# Altium PCB PCB1.PcbDoc (part 2 of 2)
Units mm, origin at the board's own origin, x right, y up, seen from the top; angles counter-clockwise.
Board outline 128 x 71 mm, 2 copper layers (Top Layer, Bottom Layer); 104 components, 107 nets, 531 pads, 522 vias.
Unrouted connection lines stored in the file: 53.
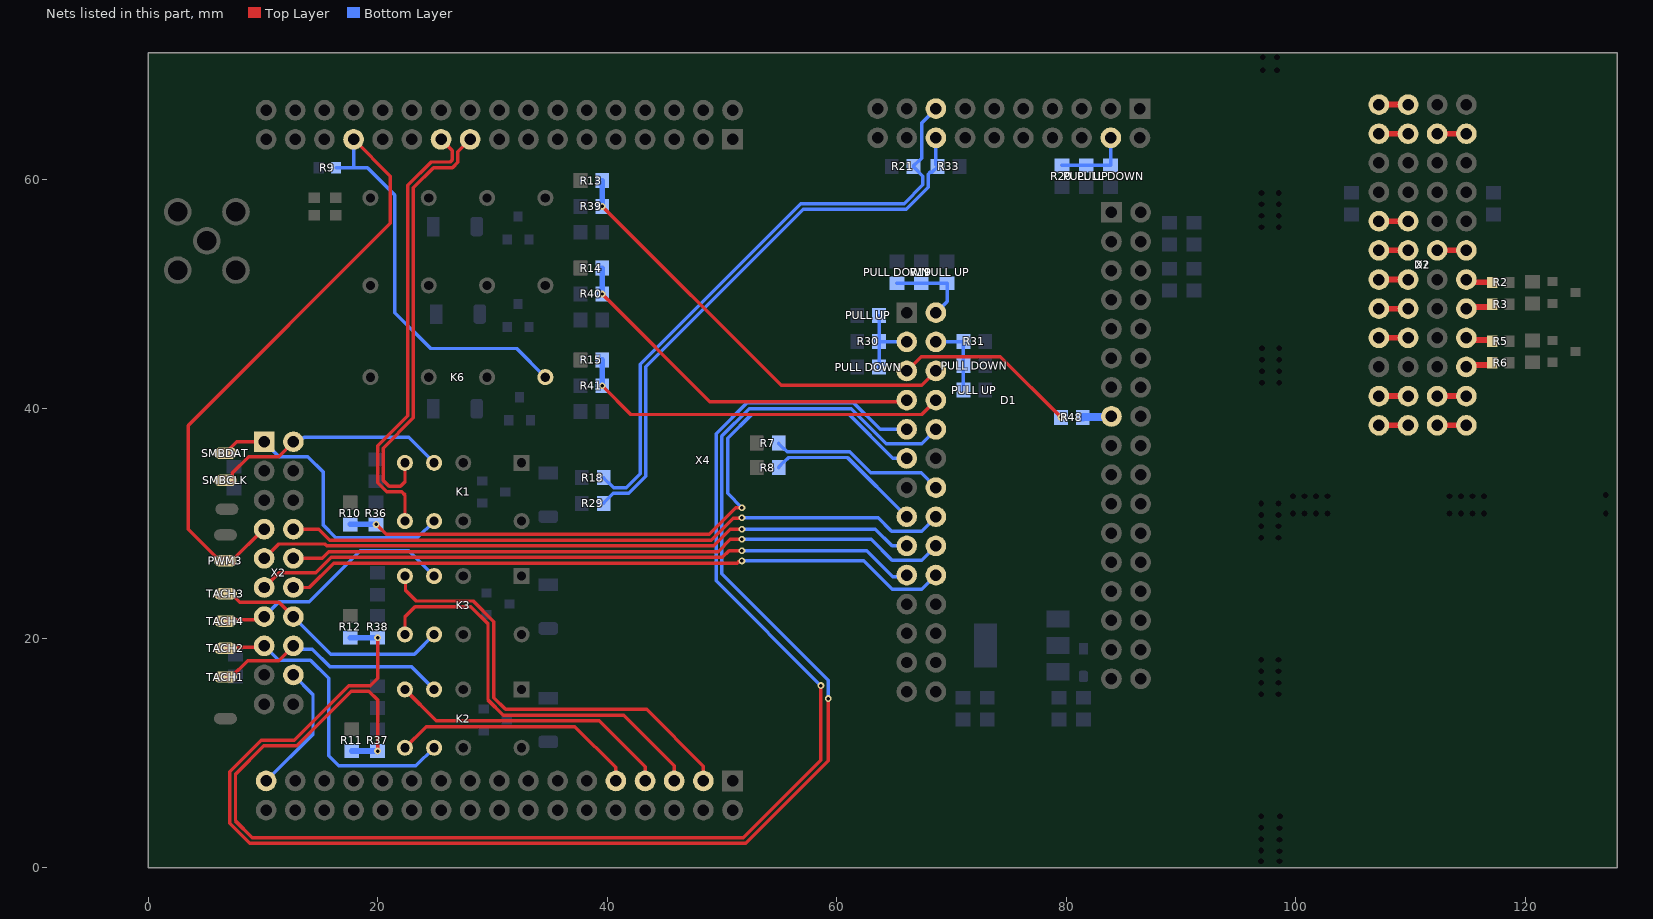
[diagram p2: the nets of this part, all layers, seen from the top]

## Via types
v1: diameter 0.6, hole 0.3, Top Layer to Bottom Layer, tented both sides, 522 vias

## Nets (pads, with @x,y where several pads share a name; then routed paths per layer and width w, separated by ;. In a path a pad name is that pad's centre, name@x,y a point inside that pad or via, vN(x,y) a via of type N, cw(c..) or ccw(c..) an arc to the next point about the centre after c; other vN are vias at no path point) (continued)
PWM3: K6.7 PWM3.1 R9.1 X2.7 X4.14 | length 85.8
  Top Layer w0.3: X2.7@10.125,29.505 10.065,29.505 7.31,26.75 6.25,26.75 3.5,29.5 3.5,38.539 21.125,56.164 21.125,60.255 X4.14@17.91,63.47
  Bottom Layer w0.3: R9.1@16.385,61 17.91,61 ; X4.14@17.91,63.47 17.91,61 ; K6.7@34.62,42.75 32.12,45.25 24.625,45.25 21.5,48.375 21.5,58.625 19.125,61 17.91,61
PWM3_LM: D2.13 X?.13 | length 2.5
  Top Layer w0.5: X?.13@112.33,38.56 D2.13@114.87,38.56
READ: D1.14X3 R7.1 | length 15.3
  Bottom Layer w0.3: R7.1@54.95,37 54.95,36.95 55.4,36.5 55.45,36.5 55.7,36.25 61.157,36.25 62.987,34.42 67.36,34.42 D1.14X3@68.65,33.13
RELE1: D1.11X3 R10.1 R36.1 | length 60.1
  Top Layer w0.3: v1(19.875,29.925) 20.75,29.05 48.886,29.05 51.211,31.375 v1(51.75,31.375)
  Bottom Layer w0.3: v1(51.75,31.375) 50.5,32.625 50.5,37.418 52.582,39.5 61.082,39.5 64.893,35.689 66.091,35.689 D1.11X3@66.11,35.67
  Bottom Layer w0.5: R10.1@17.625,29.925 v1(19.875,29.925)
RELE2: D1.9X3 R11.1 R37.1 | length 131.8
  Top Layer w0.3: v1(20,10.175) 20,14.625 19.25,15.375 17.707,15.375 12.957,10.625 10.082,10.625 7.625,8.168 7.625,4.082 9.082,2.625 51.875,2.625 58.625,9.375 v1(58.625,15.875)
  Bottom Layer w0.3: v1(58.625,15.875) 49.5,25 49.5,37.832 52.168,40.5 61.497,40.5 63.787,38.21 D1.9X3@66.11,38.21
  Bottom Layer w0.5: R11.1@17.75,10.175 v1(20,10.175)
RELE3: D1.10X3 R12.1 R38.1 | length 136.1
  Top Layer w0.3: v1(20,20.05) 20,16.5 19.375,15.875 17.5,15.875 12.75,11.125 9.875,11.125 7.125,8.375 7.125,3.875 8.875,2.125 52.082,2.125 59.275,9.318 v1(59.275,14.75)
  Bottom Layer w0.3: v1(59.275,14.75) 59.275,16.35 50,25.625 50,37.625 52.375,40 61.29,40 64.33,36.96 67.4,36.96 D1.10X3@68.65,38.21
  Bottom Layer w0.5: R12.1@17.625,20.05 v1(20,20.05)
RELE4: D1.6X3 R13.1 R39.1 | length 38.3
  Top Layer w0.3: v1(39.575,57.625) 55.16,42.04 67.4,42.04 D1.6X3@68.65,43.29
  Bottom Layer w0.5: v1(39.575,57.625) R13.1@39.575,59.875
RELE5: D1.7X3 R14.1 R40.1 | length 32.7
  Top Layer w0.3: v1(39.575,50) 48.95,40.625 65.985,40.625 D1.7X3@66.11,40.75
  Bottom Layer w0.5: v1(39.575,50) R14.1@39.575,52.25
RELE6: D1.8X3 R15.1 R41.1 | length 32.9
  Top Layer w0.3: v1(39.575,42) 42.075,39.5 67.4,39.5 D1.8X3@68.65,40.75
  Bottom Layer w0.5: v1(39.575,42) R15.1@39.575,44.25
REMOTE1+_LM: D2.18 R2.2 | length 2.4
  Top Layer w0.5: D2.18@114.87,51.26 115.119,51.011 116.915,51.011 116.979,51.075 R2.2@117.115,51.075
REMOTE1-_LM: D2.17 R3.2 | length 2.4
  Top Layer w0.5: D2.17@114.87,48.72 115.025,48.875 116.915,48.875 117.115,49.075 R3.2@117.115,49.125
REMOTE2+_LM: D2.16 R5.2 | length 2.4
  Top Layer w0.5: D2.16@114.87,46.18 115.05,46 116.99,46 R5.2@117.115,45.875
REMOTE2-_LM: D2.15 R6.2 | length 2.4
  Top Layer w0.5: D2.15@114.87,43.64 115.05,43.82 116.935,43.82 R6.2@117.115,44
RESET_MC: D1.5X3 R48.1 | length 16.1
  Top Layer w0.3: D1.5X3@66.11,43.29 67.36,44.54 74.26,44.54 v1(79.55,39.25)
RST_IN: R48.2 X4.OUT3 | length 2.5
  Bottom Layer w0.7: R48.2@81.45,39.25 81.49,39.29 83.91,39.29 X4.OUT3@83.95,39.33
SCL_F: K1.5 X4.10 | length 37.7
  Top Layer w0.3: K1.5@22.39,35.29 22.39,33.64 22,33.25 21,33.25 20.5,33.75 20.5,36.574 23.125,39.199 23.125,59.25 24.875,61 26.531,61 27,61.469 27,62.4 X4.10@28.07,63.47
SCL_MC: D1.15X2 R18.2 R21.1 | length 52.5
  Bottom Layer w0.3: R18.2@39.7,34 39.7,33.95 40.15,33.5 40.2,33.5 40.575,33.125 41.668,33.125 42.875,34.332 42.875,43.875 56.875,57.875 65.875,57.875 67.5,59.5 67.5,60.275 66.7,61.075 R21.1@66.7,61.125 66.7,61.175 67.15,61.625 67.2,61.625 67.4,61.825 67.4,64.9 D1.15X2@68.65,66.15
SDA_F: K1.8 X4.11 | length 39.1
  Top Layer w0.3: K1.8@22.39,30.21 22.39,32.485 22.125,32.75 20.793,32.75 20,33.543 20,36.781 22.625,39.406 22.625,59.457 24.668,61.5 26.324,61.5 26.5,61.676 26.5,62.5 X4.11@25.53,63.47
SDA_MC: D1.16X2 R29.2 R33.1 | length 50.1
  Bottom Layer w0.3: R29.2@39.7,31.75 39.7,31.8 40.15,32.25 40.525,32.625 41.875,32.625 43.375,34.125 43.375,43.668 57.082,57.375 66.082,57.375 68,59.293 68,60.449 68.176,60.625 68.35,60.625 68.8,61.075 R33.1@68.8,61.125 68.65,61.275 D1.16X2@68.65,63.61
SMBCLK: K1.4 SMBCLK.1 X2.2 | length 20.8
  Top Layer w0.3: SMBCLK.1@6.75,33.75 7.018,33.75 7.341,34.073 7.341,34.402 8.774,35.835 11.375,35.835 X2.2@12.665,37.125
  Bottom Layer w0.3: X2.2@12.665,37.125 12.952,37.412 13.503,37.412 13.591,37.5 22.72,37.5 K1.4@24.93,35.29
SMBCLK_LM: D2.2 X?.2 | length 2.5
  Top Layer w0.5: D2.2@107.25,63.96 X?.2@109.79,63.96
SMBDAT: K1.9 SMBDAT.1 X2.1 | length 25.4
  Top Layer w0.3: SMBDAT.1@6.75,36.125 7.75,37.125 X2.1@10.125,37.125
  Bottom Layer w0.3: X2.1@10.125,37.125 11.415,35.835 13.915,35.835 15.25,34.5 15.25,29.875 16.375,28.75 23.47,28.75 K1.9@24.93,30.21
SMBDAT_LM: D2.1 X?.1 | length 2.5
  Top Layer w0.5: D2.1@107.25,66.5 X?.1@109.79,66.5
TACH1: K2.4 TACH1.1 X2.16 | length 20.9
  Top Layer w0.3: TACH1.1@6.75,16.625 7.25,16.625 8.68,18.055 11.375,18.055 X2.16@12.665,19.345
  Bottom Layer w0.3: X2.16@12.665,19.345 12.95,19.06 14.315,19.06 15.875,17.5 22.97,17.5 K2.4@24.93,15.54
TACH1_F: K2.5 X4.62 | length 25
  Top Layer w0.3: K2.5@22.39,15.54 25.121,12.809 39.316,12.809 43.31,8.815 X4.62@43.31,7.57
TACH1_LM: D2.11 X?.11 | length 2.5
  Top Layer w0.5: D2.11@107.25,41.1 X?.11@109.79,41.1
TACH1_MC: "PULL DOWN.2"@65.25,50.925 "PULL UP.1"@69.625,50.925 D1.2X3 R19.2 | length 7.3
  Bottom Layer w0.3: 65.25,50.925 R19.2@67.375,50.925 69.625,50.925 69.625,49.345 D1.2X3@68.65,48.37
TACH2: K2.9 TACH2.1 X2.15 | length 27.2
  Top Layer w0.3: TACH2.1@6.75,19.125 6.86,19.235 10.015,19.235 X2.15@10.125,19.345
  Bottom Layer w0.3: X2.15@10.125,19.345 11.375,18.095 14.155,18.095 15.75,16.5 15.75,9.75 16.625,8.875 23.345,8.875 K2.9@24.93,10.46
TACH2_F: K2.8 X4.61 | length 21.8
  Top Layer w0.3: K2.8@22.39,10.46 24.239,12.309 37.191,12.309 40.756,8.744 40.756,7.584 X4.61@40.77,7.57
TACH2_LM: D2.12 X?.12 | length 2.5
  Top Layer w0.5: D2.12@107.25,38.56 X?.12@109.79,38.56
TACH2_MC: "PULL DOWN.2"@63.7,43.625 "PULL UP.1"@63.7,48.125 D1.3X3 R30.2 | length 6.9
  Bottom Layer w0.3: 63.7,43.625 63.7,48.125 ; R30.2@63.7,45.875 63.745,45.83 D1.3X3@66.11,45.83
TACH3: K3.9 TACH3.1 X2.14 | length 21.1
  Top Layer w0.3: TACH3.1@6.75,23.875 7.25,23.875 7.99,23.135 11.415,23.135 X2.14@12.665,21.885
  Bottom Layer w0.3: X2.14@12.665,21.885 15.925,18.625 23.22,18.625 K3.9@24.93,20.335
TACH3_F: K3.8 X4.63 | length 36.3
  Top Layer w0.3: K3.8@22.39,20.335 22.39,21.875 23.265,22.75 28.125,22.75 29.625,21.25 29.625,14.625 30.941,13.309 41.441,13.309 45.85,8.9 X4.63@45.85,7.57
TACH3_LM: D2.9 X?.9 | length 2.5
  Top Layer w0.5: D2.9@107.25,46.18 X?.9@109.79,46.18
TACH3_MC: "PULL DOWN.2"@71.05,43.75 "PULL UP.1"@71.05,41.625 D1.4X3 R31.2 | length 6.7
  Bottom Layer w0.3: D1.4X3@68.65,45.83 71.005,45.83 R31.2@71.05,45.875 71.05,43.75 71.05,41.625
TACH4: K3.4 TACH4.1 X2.13 | length 21.6
  Top Layer w0.3: TACH4.1@6.75,21.5 6.875,21.625 9.865,21.625 X2.13@10.125,21.885
  Bottom Layer w0.3: X2.13@10.125,21.885 11.415,23.175 14.05,23.175 18.5,27.625 22.72,27.625 K3.4@24.93,25.415
TACH4_F: K3.5 X4.64 | length 38.7
  Top Layer w0.3: K3.5@22.39,25.415 22.434,25.371 22.434,24.191 23.375,23.25 28.332,23.25 30.125,21.457 30.125,14.832 31.148,13.809 43.441,13.809 48.39,8.86 X4.64@48.39,7.57
TACH4_LM: D2.14 X?.14 | length 2.5
  Top Layer w0.5: X?.14@112.33,41.1 D2.14@114.87,41.1
TACH4_MC: "PULL DOWN.2"@83.875,61.2 "PULL UP.1"@81.75,61.2 D1.4X2 R20.2 | length 6.7
  Bottom Layer w0.3: R20.2@79.625,61.2 83.875,61.2 83.89,61.215 D1.4X2@83.89,63.61
VCCP_IN: X2.18 X4.49 | length 11.6
  Bottom Layer w0.3: X4.49@10.29,7.57 14.375,11.655 14.375,15.095 X2.18@12.665,16.805
VCCP_IN_LM: D2.23 X?.23 | length 2.5
  Top Layer w0.5: X?.23@112.33,63.96 D2.23@114.87,63.96
VID0: D1.16X3 X2.8 | length 58.2
  Top Layer w0.3: X2.8@12.665,29.505 14.87,29.505 15.825,28.55 49.093,28.55 51,30.457 51.707,30.457 v1(51.75,30.5)
  Bottom Layer w0.3: v1(51.75,30.5) 63.625,30.5 64.785,29.34 67.4,29.34 D1.16X3@68.65,30.59
VID0_LM: D2.5 X?.5 | length 2.5
  Top Layer w0.5: D2.5@107.25,56.34 X?.5@109.79,56.34
VID1: D1.17X3 X2.9 | length 57.8
  Top Layer w0.3: X2.9@10.125,26.965 11.375,28.215 15.41,28.215 15.575,28.05 49.3,28.05 50.75,29.5 v1(51.75,29.5)
  Bottom Layer w0.3: v1(51.75,29.5) 63.375,29.5 64.825,28.05 D1.17X3@66.11,28.05
VID1_LM: D2.6 X?.6 | length 2.5
  Top Layer w0.5: D2.6@107.25,53.8 X?.6@109.79,53.8
VID2: D1.18X3 X2.10 | length 57.9
  Top Layer w0.3: X2.10@12.665,26.965 15.176,26.965 15.761,27.55 49.675,27.55 50.75,28.625 v1(51.75,28.625)
  Bottom Layer w0.3: v1(51.75,28.625) 63,28.625 64.825,26.8 67.4,26.8 D1.18X3@68.65,28.05
VID2_LM: D2.7 X?.7 | length 2.5
  Top Layer w0.5: D2.7@107.25,51.26 X?.7@109.79,51.26
VID3: D1.19X3 X2.11 | length 58.3
  Top Layer w0.3: X2.11@10.125,24.425 11.415,25.715 14.633,25.715 15.968,27.05 50.05,27.05 50.625,27.625 v1(51.75,27.625)
  Bottom Layer w0.3: v1(51.75,27.625) 62.625,27.625 64.875,25.375 65.975,25.375 D1.19X3@66.11,25.51
VID3_LM: D2.8 X?.8 | length 2.5
  Top Layer w0.5: D2.8@107.25,48.72 X?.8@109.79,48.72
VID4: D1.20X3 X2.12 | length 58.5
  Top Layer w0.3: X2.12@12.665,24.425 14.05,24.425 16.175,26.55 51.35,26.55 51.492,26.693 51.693,26.693 v1(51.75,26.75)
  Bottom Layer w0.3: v1(51.75,26.75) 62.375,26.75 64.865,24.26 67.4,24.26 D1.20X3@68.65,25.51
VID4_LM: D2.19 X?.19 | length 2.5
  Top Layer w0.5: X?.19@112.33,53.8 D2.19@114.87,53.8
WRITE: D1.15X3 R8.1 | length 13.7
  Bottom Layer w0.3: R8.1@54.95,34.875 54.95,34.925 55.4,35.375 55.45,35.375 55.825,35.75 60.95,35.75 D1.15X3@66.11,30.59
pads on no net: D1.1X3 D1.6X2 D1.8X2 D1.9X2 D1.10X2 D1.11X2 D1.12X2 D1.12X3 D1.13X2 D1.13X3 D1.14X2 D1.17X2 D1.18X2 D1.19X2 D1.20X2 X4.1 X4.2 X4.3 X4.4 X4.5 X4.6 X4.7 X4.8 X4.9 X4.17 X4.18 X4.19 X4.20 X4.21 X4.22 X4.23 X4.24 X4.25 X4.26 X4.27 X4.28 X4.29 X4.30 X4.31 X4.34 X4.35 X4.36 X4.37 X4.38 X4.39 X4.40 X4.41 X4.42 X4.43 X4.44 X4.45 X4.46 X4.47 X4.48 X4.50 X4.51 X4.52 X4.53 X4.54 X4.55 X4.56 X4.57 X4.58 X4.59 X4.60 X4.+12V X4.-12V X4.IN-OUT2 X4.IN-OUT3 X4.IN-OUT4 X4.IN-OUT5 X4.IN-OUT6 X4.IN-OUT7 X4.IN-OUT8 X4.NC X4.OUT4 X4.OUT5 X4.OUT6 X4.OUT7 X4.OUT8 X4.VDDF X4.VDDS X4.VEEF X4.VEES

## Polygon pours and split planes (outlines as drawn)
GND_LM on Top Layer "NONET_L-01_P-001" (solid, remove dead copper, pour order 1): 127,70 101.75,70 101.75,35.625 127,35.625
GND on Top Layer "NONET_L-01_P-001" (solid, remove dead copper, pour order 0): 0.5,70.5 0.5,0.503 93.75,0.503 93.75,70.5
GND on Bottom Layer "NONET_L-01_P-001" (solid, remove dead copper, pour order 3): 0.5,70.5 0.5,0.5 93.75,0.5 93.75,70.5
GND_LM on Bottom Layer "NONET_L-01_P-001" (solid, remove dead copper, pour order 2): 101.75,70 101.75,35.625 127,35.625 127,70

## Other copper
Top Layer:
  pour cut-out: 25.838,10.46 25.838,12.309 24.239,12.309
  pour cut-out: 22.39,9.552 24.93,9.552 24.93,10.46
  pour cut-out: 83.95,38.221 81.75,38.221 81.75,39.67
  pour cut-out: 85.059,39.33 85.059,41.87 83.95,41.87
  pour cut-out: 26.668,60.67 25.375,60.67 25.375,59.25
  pour cut-out: 13.939,66.01 13.939,68.625 12.25,68.625
  pour cut-out: 11.721,66.01 11.721,68.125 11.87,68.125
  pour cut-out: 16.801,63.47 16.801,60.5 18.75,60.5
  pour cut-out: 13.774,14.265 13.774,16.805 12.665,16.805
  pour cut-out: 10.125,13.156 12.665,13.156 12.665,14.265
  pour cut-out: 121.279,43.25 123.025,43.25 123.025,46.75
  pour cut-out: 120.921,46.75 123.025,46.75 123.025,46.287
  pour cut-out: 121.475,46.75 121.475,43.25 115,43.25 115,46.75 119.775,46.75
  pour cut-out: 123.025,51.439 123.025,48.375 115.625,48.375 115.625,50.5 115.875,50.5
  pour cut-out: 120.785,50.275 123.025,50.275 123.025,50.768
  pour cut-out: 121.046,51.875 123.025,51.875 123.025,51.439
  pour cut-out: 116.465,50.275 116.465,51.875 115.66,51.875 115.66,50.275
  pour cut-out: 121.475,51.875 116.465,51.875 116.465,50.275 121.475,50.275
  pour cut-out: 116.465,51.7 114.87,51.7 114.87,51.26
  pour cut-out: 109.79,62.851 112.33,62.851 112.33,63.96
  pour cut-out: 111.221,61.42 111.221,58.88 112.33,58.88
  pour cut-out: 111.221,61.42 111.221,66.5 112.33,66.5
  pour cut-out: 110.899,43.64 110.899,41.1 109.79,41.1
  pour cut-out: 110.899,43.64 110.899,53.8 109.79,53.8
  pour cut-out: 112.33,42.209 107.25,42.209 107.25,41.1
  pour cut-out: 112.33,42.209 114.87,42.209 114.87,41.1
  pour cut-out: 113.761,43.64 113.761,41.1 114.87,41.1
  pour cut-out: 113.761,43.64 113.761,51.26 114.87,51.26
  pour cut-out: 113.761,51.26 113.761,53.8 114.87,53.8
  pour cut-out: 112.33,52.691 114.87,52.691 114.87,53.8
  pour cut-out: 112.33,52.691 107.25,52.691 107.25,53.8
  pour cut-out: 107.25,59.989 114.884,59.989 114.884,58.866
  pour cut-out: 106.141,38.56 106.141,58.88 107.25,58.88
  pour cut-out: 114.87,37.451 107.25,37.451 107.25,38.56
  pour cut-out: 115.979,66.5 115.979,38.56 114.87,38.56
  pour cut-out: 107.25,67.609 114.87,67.609 114.87,66.5
  pour cut-out: 107.25,62.851 109.79,62.851 109.79,63.96
  pour cut-out: 106.141,66.5 106.141,63.96 107.25,63.96
  pour cut-out: 17.125,62.685 18.598,62.685 18.598,61.273
  pour cut-out: 28.855,62.685 26.668,62.685 26.668,60.67
  pour cut-out: 27.33,61.332 27.33,63.47 29.179,63.47
  pour cut-out: 23.298,20.335 23.298,22.75 22.75,22.75
  pour cut-out: 29.268,14.625 29.268,12.75 30.25,12.75
  pour cut-out: 65.001,43.25 65.001,40.688 66.048,40.688
  pour cut-out: 65.001,45.83 65.001,43.25 66.11,43.25 66.11,43.29
  pour cut-out: 66.11,46.939 68.65,46.939 68.65,45.83
  pour cut-out: 65.001,38.21 65.001,40.75 66.11,40.75
  pour cut-out: 69.759,38.21 69.759,40.75 68.65,40.75
  pour cut-out: 66.11,37.101 68.75,37.101 68.75,38.375
  pour cut-out: 69.759,43.29 69.759,45.83 68.65,45.83
  pour cut-out: 69.759,43.29 69.759,40.75 68.65,40.75
  pour cut-out: 87.599,46.95 87.599,44.41 86.49,44.41
  pour cut-out: 83.95,48.059 86.49,48.059 86.49,46.95
  pour cut-out: 82.878,47.237 82.878,44.41 83.95,44.41
  pour cut-out: 83.95,40.761 86.49,40.761 86.49,41.87
  pour cut-out: 87.599,44.41 87.599,41.87 86.49,41.87
  pour cut-out: 69.759,22.97 69.759,20.43 68.65,20.43
  pour cut-out: 66.11,24.079 68.65,24.079 68.65,22.97
  pour cut-out: 65.001,22.97 65.001,20.43 66.11,20.43
  pour cut-out: 69.759,15.35 69.759,17.918 68.559,17.918
  pour cut-out: 64.963,15.477 64.963,17.238 63.92,17.238
  pour cut-out: 67.166,15.505 68.559,15.505 68.559,17.918
  pour cut-out: 59.096,16.07 59.096,14.945 59.746,14.945
  pour cut-out: 52.375,44.875 52.375,40.625 54.5,40.625
  pour cut-out: 46.125,43.375 46.125,39.5 48.125,39.5
  pour cut-out: 40.77,6.461 48.39,6.461 48.39,7.57
  pour cut-out: 39.661,7.57 39.661,9.625 40.375,9.625
  pour cut-out: 25.368,42.75 25.368,41 24.75,41
  pour cut-out: 19.365,29.925 19.365,28.625 20.25,28.625
  pour cut-out: 21.512,30.435 21.512,33.64 22.39,33.64
  pour cut-out: 19.875,30.435 22.39,30.435 22.39,30.21
  pour cut-out: 28.378,25.415 28.378,22.875 27.5,22.875
  pour cut-out: 28.378,25.415 28.378,27.125 28,27.125
  pour cut-out: 21.482,25.415 21.482,27.625 22.5,27.625
  pour cut-out: 22.077,24.57 22.077,20.335 22.39,20.335
  pour cut-out: 21.482,15.54 21.482,10.46 22.39,10.46
  pour cut-out: 13.774,16.805 13.774,24.425 12.665,24.425
  pour cut-out: 12.665,15.696 10.125,15.696 10.125,16.805
  pour cut-out: 10.125,15.696 5.567,15.696 5.567,16.625
  pour cut-out: 5.567,26.928 5.567,16.625 6.75,16.625
  pour cut-out: 9.016,26.965 9.016,29.505 10.125,29.505
  pour cut-out: 13.774,32.045 13.774,29.505 12.665,29.505
  pour cut-out: 12.665,33.154 10.125,33.154 10.125,32.045
  pour cut-out: 11.234,34.585 11.234,32.045 10.125,32.045
  pour cut-out: 12.665,36.016 10.125,36.016 10.125,37.125
  pour cut-out: 11.234,34.585 11.234,37.125 10.125,37.125
  pour cut-out: 10.878,38.225 12.665,38.225 12.665,36.86
  pour cut-out: 9.527,38.225 4,38.225 4,36.053
  pour cut-out: 13.8,59.035 17.075,59.035 17.075,56.215 13.75,56.215 13.75,56.25
  pour cut-out: 25.368,58.375 25.368,42.75 24.46,42.75
  pour cut-out: 25.368,58.375 25.368,61.5 24.668,61.5
  pour cut-out: 19.38,57.467 21.125,57.467 21.125,58.291
  pour cut-out: 18.598,58.834 18.598,63.47 20.45,63.47
  pour cut-out: 28.07,62.361 25.53,62.361 25.53,63.47
  pour cut-out: 25.53,64.579 28.07,64.579 28.07,63.47
  pour cut-out: 22.99,64.579 25.53,64.579 25.53,63.47
  pour cut-out: 20.45,64.579 22.99,64.579 22.99,63.47
  pour cut-out: 17.91,64.579 20.45,64.579 20.45,63.47
Bottom Layer:
  pour cut-out: 31.673,20.57 31.673,23 33.25,23
  pour cut-out: 31.642,10.46 31.642,13 32.875,13
  pour cut-out: 31.673,30.445 31.673,32.75 33.25,32.75
  pour cut-out: 28.378,30.21 28.378,29.125 27.75,29.125
  pour cut-out: 28.378,30.21 28.378,32 27.25,32
  pour cut-out: 16.238,28.819 16.238,25.75 17.114,25.75
  pour cut-out: 24.93,24.507 27.47,24.507 27.47,25.415
  pour cut-out: 17.122,12.875 15.5,12.875 15.5,11.571
  pour cut-out: 12.83,6.461 10.29,6.461 10.29,7.57
  pour cut-out: 11.399,5.03 11.399,2.25 10.25,2.25
  pour cut-out: 11.399,5.03 11.399,7.57 10.29,7.57
  pour cut-out: 24.93,9.552 22.39,9.552 22.39,10.46
  pour cut-out: 25.838,10.46 25.838,12.25 24,12.25
  pour cut-out: 27.107,59.25 27.107,60.75 26.375,60.75
  pour cut-out: 23.795,59.768 22.812,59.768 22.812,60.125
  pour cut-out: 14.261,63.47 14.261,61 14.865,61
  pour cut-out: 12.83,6.461 15.37,6.461 15.37,7.57
  pour cut-out: 10.125,15.696 7.69,15.696 7.69,16.74
  pour cut-out: 68.65,44.721 71.05,44.721 71.05,45.875
  pour cut-out: 68.65,46.939 71.005,46.939 71.005,45.83
  pour cut-out: 66.11,46.939 63.723,46.939 63.723,45.853
  pour cut-out: 66.11,44.721 63.7,44.721 63.7,45.875
  pour cut-out: 114.87,59.989 118.1,59.989 118.1,58.025 114.75,58.025 114.75,58
  pour cut-out: 107.25,59.989 104.025,59.989 104.025,58.025 107.25,58.025 107.25,57.875
  pour cut-out: 16.107,16.5 16.107,17.75 15.25,17.75
  pour cut-out: 20.85,14.725 19.15,14.725 19.15,9.232 20.85,9.232
  pour cut-out: 16.9,12.875 20.85,12.875 20.85,7.875 16.875,7.875
  pour cut-out: 29.54,43.658 29.54,41 32.375,41
  pour cut-out: 29.54,51.658 29.54,49.1 32.25,49.1
  pour cut-out: 29.54,59.283 29.54,56.779 32.25,56.779
  pour cut-out: 68.357,59.293 68.357,56.875 67.245,56.875
  pour cut-out: 86.49,50.921 89,50.921 89,52.2
  pour cut-out: 86.49,55.679 89,55.679 89,54.3
  pour cut-out: 91.975,55.4 88.15,55.4 88.15,57 91.975,57
  pour cut-out: 91.975,51.1 91.975,49.5 89.5,49.5 89.5,51.125
  pour cut-out: 88.15,57 89.85,57 89.85,49.5 88.15,49.5
  pour cut-out: 82.841,54.57 82.841,52.04 83.96,52.04
  pour cut-out: 83.95,53.139 86.533,53.139 86.533,52.073
  pour cut-out: 83.95,50.921 86.49,50.921 86.49,52.03
  pour cut-out: 83.95,55.679 86.49,55.679 86.49,54.57
  pour cut-out: 83.95,53.461 86.49,53.461 86.49,54.57
  pour cut-out: 84.999,63.61 84.999,60.4 82.6,60.4
  pour cut-out: 84.725,60.4 84.725,63.61 83.89,63.61
  pour cut-out: 82.781,63.61 82.781,60.4 84.725,60.4
  pour cut-out: 84.725,60.4 78.775,60.4 78.775,62 84.725,62
  pour cut-out: 78.775,62 78.775,58.5 82.6,58.5 82.6,62
  pour cut-out: 81.8,40.1 83.95,40.1 83.95,39.126
  pour cut-out: 81.696,38.4 83.95,38.4 83.95,39.633
  pour cut-out: 78.75,40.1 78.75,38.4 82.25,38.4 82.25,40.1
  pour cut-out: 78.075,20.325 78.075,16.125 79.75,16.125
  pour cut-out: 83.95,20.119 79.275,20.119 79.275,19.375
  pour cut-out: 83.95,17.901 79.275,17.901 79.275,19.375
  pour cut-out: 80.059,18.025 82.35,18.025 82.35,15.092
  pour cut-out: 86.49,20.119 83.95,20.119 83.95,19.01
  pour cut-out: 86.49,17.901 83.95,17.901 83.95,19.01
  pour cut-out: 78.525,15.625 78.525,14.025 82.35,14.025 82.35,15.625
  pour cut-out: 73.975,15.625 73.975,14.025 70.125,14.025 70.125,15.75
  pour cut-out: 41.875,32.268 44.375,32.268 44.375,33.625
  pour cut-out: 41.874,22.892 45.375,22.892 45.375,24.625
  pour cut-out: 58.265,15.515 58.915,15.515 58.915,14.39
  pour cut-out: 65.001,22.97 65.001,25.51 66.11,25.51
  pour cut-out: 66.11,21.861 68.65,21.861 68.65,22.97
  pour cut-out: 67.541,15.35 67.541,22.97 68.65,22.97
  pour cut-out: 69.759,22.97 69.759,15.35 68.65,15.35
  pour cut-out: 69.759,25.51 69.759,22.97 68.65,22.97
  pour cut-out: 69.759,28.05 69.759,25.51 68.65,25.51
  pour cut-out: 69.759,30.59 69.759,28.05 68.65,28.05
  pour cut-out: 69.759,33.13 69.759,30.59 68.65,30.59
  pour cut-out: 69.759,35.67 69.759,33.13 68.65,33.13
  pour cut-out: 69.759,38.21 69.759,35.67 68.65,35.67
  pour cut-out: 69.759,40.75 69.759,38.21 68.65,38.21
  pour cut-out: 66.11,41.859 68.65,41.859 68.65,40.75
  pour cut-out: 65.001,40.75 65.001,38.21 66.11,38.21
  pour cut-out: 73.75,42.475 73.75,40.775 71.625,40.775 71.625,42.5
  pour cut-out: 71.85,46.725 71.85,45.025 73.75,45.025 73.75,46.725
  pour cut-out: 70.25,46.725 70.25,40.775 71.85,40.775 71.85,46.725
  pour cut-out: 67.541,48.37 67.541,50.925 69.625,50.925
  pour cut-out: 64.5,48.975 64.5,42.775 62.875,42.775 62.875,48.625
  pour cut-out: 61,48.975 61,45.025 64.5,45.025 64.5,48.975
  pour cut-out: 70.475,50.125 70.475,53.625 66.525,53.625 66.525,50.875 66.625,50.875
  pour cut-out: 64.4,51.725 70.475,51.725 70.475,50.125 64.4,50.125
  pour cut-out: 69.759,63.61 69.759,61.2 68.725,61.2
  pour cut-out: 69.759,66.15 69.759,63.61 68.65,63.61
  pour cut-out: 66.11,67.259 68.65,67.259 68.65,66.15
  pour cut-out: 65.001,66.15 65.001,63.61 66.11,63.61
  pour cut-out: 65.001,63.61 65.001,61.175 66.7,61.175
  pour cut-out: 64,61.975 71.5,61.975 71.5,60.275 64,60.275
  pour cut-out: 52.11,26.39 52.11,24 51.5,24
  pour cut-out: 35.934,21.125 35.934,19.125 34.625,19.125
  pour cut-out: 31.642,20.335 31.642,19 32.5,19
  pour cut-out: 35.925,25.4 35.925,26.625 32.903,26.625
  pour cut-out: 20.85,19.25 19.15,19.25 19.15,24.6 20.85,24.6
  pour cut-out: 16.775,22.75 20.85,22.75 20.85,19.25 16.775,19.25
  pour cut-out: 25.838,20.335 25.838,15.54 24.93,15.54
  pour cut-out: 36.799,7.57 36.799,10.125 36.125,10.125
  pour cut-out: 28.07,6.461 35.69,6.461 35.69,7.57
  pour cut-out: 26.961,7.57 26.961,10.46 27.47,10.46
  pour cut-out: 24.099,7.57 24.099,9.25 23.625,9.25
  pour cut-out: 17.91,6.461 22.99,6.461 22.99,7.57
  pour cut-out: 15.37,6.461 17.91,6.461 17.91,7.57
  pour cut-out: 10.125,15.696 12.665,15.696 12.665,16.805
  pour cut-out: 9.033,19.345 9.033,16.805 10.125,16.805
  pour cut-out: 9.033,21.75 9.033,19.345 10.125,19.345
  pour cut-out: 13.737,24.712 13.737,21.885 12.665,21.885
  pour cut-out: 10.125,20.776 12.665,20.776 12.665,21.885
  pour cut-out: 9.016,24.425 9.016,21.75 10.25,21.75
  pour cut-out: 10.125,25.534 12.665,25.534 12.665,24.425
  pour cut-out: 15.25,34.5 15.25,37.125 13.935,37.125
  pour cut-out: 13.75,34.735 14.688,34.735 14.688,35.148
  pour cut-out: 11.513,34.758 10.12,34.758 10.12,37.171
  pour cut-out: 10.917,38.225 12.665,38.225 12.665,36.89
  pour cut-out: 9.296,38.225 7.375,38.225 7.375,36.508
  pour cut-out: 16.775,32.625 16.775,28.75 20.725,28.75 20.725,34.475 19.025,34.475 19.025,32.625
  pour cut-out: 34.834,31.359 37.875,31.359 37.875,30.625
  pour cut-out: 31.673,30.445 31.673,29 32.125,29
  pour cut-out: 31.65,34.39 36,34.39 36,36.75
  pour cut-out: 31.65,34.39 31.65,36.75 33.125,36.75
  pour cut-out: 33.825,33.65 37.78,33.65 37.78,34.97
  pour cut-out: 37,34.85 37,30.9 40.5,30.9 40.5,34.85
  pour cut-out: 38.475,45.1 38.475,41.15 40.375,41.15 40.375,45.1
  pour cut-out: 36.875,40.6 36.875,45.1 38.475,45.1 38.475,38.9
  pour cut-out: 38.475,53.1 38.475,49.15 40.375,49.15 40.375,53.1
  pour cut-out: 36.875,53.1 36.875,46.9 38.475,46.9 38.475,53.1
  pour cut-out: 38.475,60.725 38.475,56.775 40.375,56.775 40.375,60.725
  pour cut-out: 36.875,56.225 36.875,60.725 38.475,60.725 38.475,56.225
  pour cut-out: 29.179,63.47 29.179,60.625 28.125,60.625
  pour cut-out: 25.53,64.579 28.07,64.579 28.07,63.47
  pour cut-out: 22.99,64.579 25.53,64.579 25.53,63.47
  pour cut-out: 20.45,64.579 22.99,64.579 22.99,63.47
  pour cut-out: 21.83,58.762 21.83,60.125 23.795,60.125
  pour cut-out: 17.91,64.579 20.45,64.579 20.45,63.47
  pour cut-out: 15.37,64.579 17.91,64.579 17.91,63.47
  pour cut-out: 14.215,61.7 17.035,61.7 17.035,60.3 14.215,60.3

## Silkscreen, mask and mechanical layers (free items; w line width, h text height)
Top Overlay:
  circle w0.2: c49.363,25.631 r0.2
  region: 11.58,67.22 11.58,64.617 14.095,64.617 14.095,67.197
  region: 82.693,50.698 87.773,50.698 87.773,53.238 82.693,53.238
  region: 82.693,55.778 87.773,55.778 87.773,53.238 82.693,53.238
  region: 107.187,67.75 107.187,69.625 106.125,69.625
  region: 107.187,67.75 107.187,69.625 108.25,69.625
  region: 8.855,38.395 8,39.25 6.625,39.25
  region: 8.855,38.395 8,39.25 8,40.75
  region: 39.4,8.82 39.4,6.28 49.56,6.28 49.56,8.82
  region: 11.5,8.797 11.5,6.269 16.527,6.269 16.527,8.797
  region: 11.58,64.717 11.58,62.14 29.36,62.14 29.36,64.68
  region: 16.486,45.249 17.486,45.249 17.486,46.249
  region: 16.486,53.249 17.486,53.249 17.486,54.249
  region: 16.5,60.875 17.5,60.875 17.5,61.875
  lines w0.2: 47.636,20.544 48.636,20.544 ; 47.636,21.544 48.636,21.544 ; 47.636,22.544 48.636,22.544 ; 47.636,23.544 48.636,23.544 ; 47.636,24.544 48.636,24.544 ; 47.636,25.544 48.636,25.544 ; 47.651,14.544 48.651,14.544 ; 47.651,15.544 48.651,15.544 ; 47.651,16.544 48.651,16.544 ; 47.651,17.544 48.651,17.544 ; 47.651,18.544 48.651,18.544 ; 47.651,19.544 48.651,19.544 ; 52.651,15.544 53.651,15.544 ; 52.651,16.544 53.651,16.544 ; 52.651,17.544 53.651,17.544 ; 52.651,18.544 53.651,18.544 ; 52.651,19.544 53.651,19.544 ; 52.651,20.544 53.651,20.544 ; 52.651,21.544 53.651,21.544 ; 52.651,22.544 53.651,22.544 ; 52.651,23.544 53.651,23.544 ; 52.651,24.544 53.651,24.544 ; 53.651,14.544 52.651,14.544 ; 53.651,25.544 52.651,25.544 ; 48.636,25.544 49.386,26.294 52.651,26.294 52.651,25.544 ; 48.636,25.544 48.651,14.544 ; 48.651,14.544 49.026,14.169 52.276,14.169 52.651,14.544 ; 52.651,14.544 52.651,25.544 ; 16.486,45.249 17.486,46.249 17.486,45.249 16.486,45.249 ; 16.486,53.249 17.486,54.249 17.486,53.249 16.486,53.249 ; 16.5,60.875 17.5,60.875 17.5,61.875 16.5,60.875 ; 106,37.375 108.375,37.375 108.375,67.75 106,67.75 106,37.375 ; 113.75,37.375 116.125,37.375 116.125,67.75 113.75,67.75 113.75,37.375
  text "GND" at 13.397,67.635 h0.6 r45
  text "5V" at 12.147,67.51 h0.6 r45
  text "ADD_EN" at 15.421,67.423 h0.6 r45
  text "PWM3" at 17.935,67.423 h0.6 r45
  text "PWM2" at 20.435,67.423 h0.6 r45
  text "PWM1" at 22.935,67.423 h0.6 r45
  text "SDA_F" at 25.508,67.423 h0.6 r45
  text "SCL_F" at 28.133,67.423 h0.6 r45
  text "PWM1 TO OSC" at 36.767,57.675 h0.6
  text "+12V" at 78.125,53.468 h2
  text "+3.3V" at 78.11,50.843 h2
  text "PWM2 TO OSC" at 36.767,49.925 h0.6
  text "КУ для ИЛ1429ТО1/1" at 104.64,49.002 h3 r90
  text "PWM OUT OSC" at 1.011,46.954 h2
  text "PWM3 TO OSC" at 36.767,42.05 h0.6
  text "TSSOP-24 to DIP7.62" at 104.671,36.25 h2 r90
  text "SDA & SCL TO MC/FK" at 34,31.88 h0.6
  text "Hardware Monitor with Integrated Fan Control" at 42.793,27.33 h3
  text "SMBDAT" at 43.551,25.193 h0.6
  text "PWM1/xTESTOUT" at 53.95,25.193 h0.6
  text "SMBCLK" at 43.551,24.184 h0.6
  text "VCCP_IN" at 53.95,24.084 h0.6
  text "GND" at 43.551,23.175 h0.6
  text "2.5V" at 53.95,23.175 h0.6
  text "3.3V" at 43.551,22.166 h0.6
  text "12V" at 53.95,22.166 h0.6
  text "TACH4 & TACH3 TO MC/FK" at 33.875,22.135 h0.6
  text "VID0" at 43.551,21.157 h0.6
  text "5V" at 53.95,21.157 h0.6
  text "VID1" at 43.551,20.148 h0.6
  text "VID4" at 53.95,20.148 h0.6
  text "VID2" at 43.551,19.139 h0.6
  text "REMOTE1+" at 53.95,19.139 h0.6
  text "VID3" at 43.551,18.13 h0.6
  text "REMOTE1-" at 53.95,18.13 h0.6
  text "TSSOP-24" at 51.1,17.845 h0.6 r90
  text "TACH3" at 43.551,17.121 h0.6
  text "REMOTE2+" at 53.95,17.121 h0.6
  text "PWM2" at 43.551,16.112 h0.6
  text "REMOTE2-" at 53.95,16.112 h0.6
  text "TACH1" at 43.551,15.103 h0.6
  text "TACH4/AddSel" at 53.95,15.103 h0.6
  text "TACH2" at 43.551,14.094 h0.6
  text "PWM3/AddEnable" at 53.95,14.094 h0.6
  text "M1-SPI-ATM64 (V2)" at 78.337,14.067 h5 r90
  text "TACH2 & TACH1 TO MC/FK" at 34,12.26 h0.6
  text "LM96000" at 64.377,7.283 h5
  text "ИЛ1429ТО1/1" at 64.383,4.246 h5
  text "2.5V" at 11.72,1.369 h0.6 r45
  text "TACH1_F" at 40.994,0.072 h0.6 r45
  text "VCCP_IN" at 13.023,0.026 h0.6 r45
  text "TACH2_F" at 38.459,0.002 h0.6 r45
  text "TACH3_F" at 43.459,0.002 h0.6 r45
  text "TACH4_F" at 46.084,0.002 h0.6 r45
Bottom Overlay:
  text "ИЛ1429ТО1/1" at 85.873,4.294 h5
Board:
  lines w0.2: 96.778,32.932 96.778,40.699 cw(c97.725,40.652) 97.778,41.598 ; 96.787,32.932 ccw(c97.787,33.274) 98.787,32.932 98.762,40.592 ccw(c97.77,40.6) 97.778,41.592 ; 98.778,5.807 cw(c97.778,6.149) 96.778,5.807 96.778,13.574 cw(c97.724,13.52) 97.778,14.467 cw(c97.77,13.475) 98.762,13.467 98.787,5.807 ; 98.778,60.057 cw(c97.778,60.399) 96.778,60.057 96.778,67.824 cw(c97.724,67.77) 97.778,68.717 cw(c97.77,67.725) 98.762,67.717 98.787,60.057 ; 98.815,19.398 cw(c97.815,19.74) 96.815,19.398 96.815,27.165 cw(c97.761,27.111) 97.815,28.057 cw(c97.807,27.065) 98.799,27.057 98.824,19.398 ; 98.815,46.523 cw(c97.815,46.865) 96.815,46.523 96.815,54.29 cw(c97.761,54.236) 97.815,55.182 cw(c97.807,54.19) 98.799,54.182 98.824,46.523 ; 112.127,32.68 cw(c111.785,31.68) 112.127,30.68 104.36,30.68 cw(c104.413,31.626) 103.467,31.68 cw(c104.459,31.672) 104.467,32.664 112.127,32.689 ; 125.717,32.643 cw(c125.375,31.643) 125.717,30.643 117.95,30.643 cw(c118.004,31.589) 117.058,31.643 cw(c118.05,31.635) 118.058,32.627 125.717,32.652 ; 0,0 128,0 128,71 0,71 0,0

## Dimensions
0,71 to 128,71 on Dimensions
0,71 to 0,0 on Dimensions

## Text inside footprints (layer, text, board x,y; h text height)
K1: Bottom Overlay "-" at 31.32,30.64 h0.6 r180; Bottom Overlay "+" at 31.47,35.95 h0.6 r180
K2: Bottom Overlay "-" at 31.32,10.89 h0.6 r180; Bottom Overlay "+" at 31.47,16.2 h0.6 r180
K3: Bottom Overlay "-" at 31.32,20.765 h0.6 r180; Bottom Overlay "+" at 31.47,26.075 h0.6 r180